# Altium PCB Teclado_V2.PcbDoc (part 2 of 2)
Units mm, origin at the board's own origin, x right, y up, seen from the top; angles counter-clockwise.
Board outline 315 x 134.96 mm, 2 copper layers (Top Layer, Bottom Layer); 272 components, 196 nets, 917 pads, 600 vias.
Unrouted connection lines stored in the file: 43.
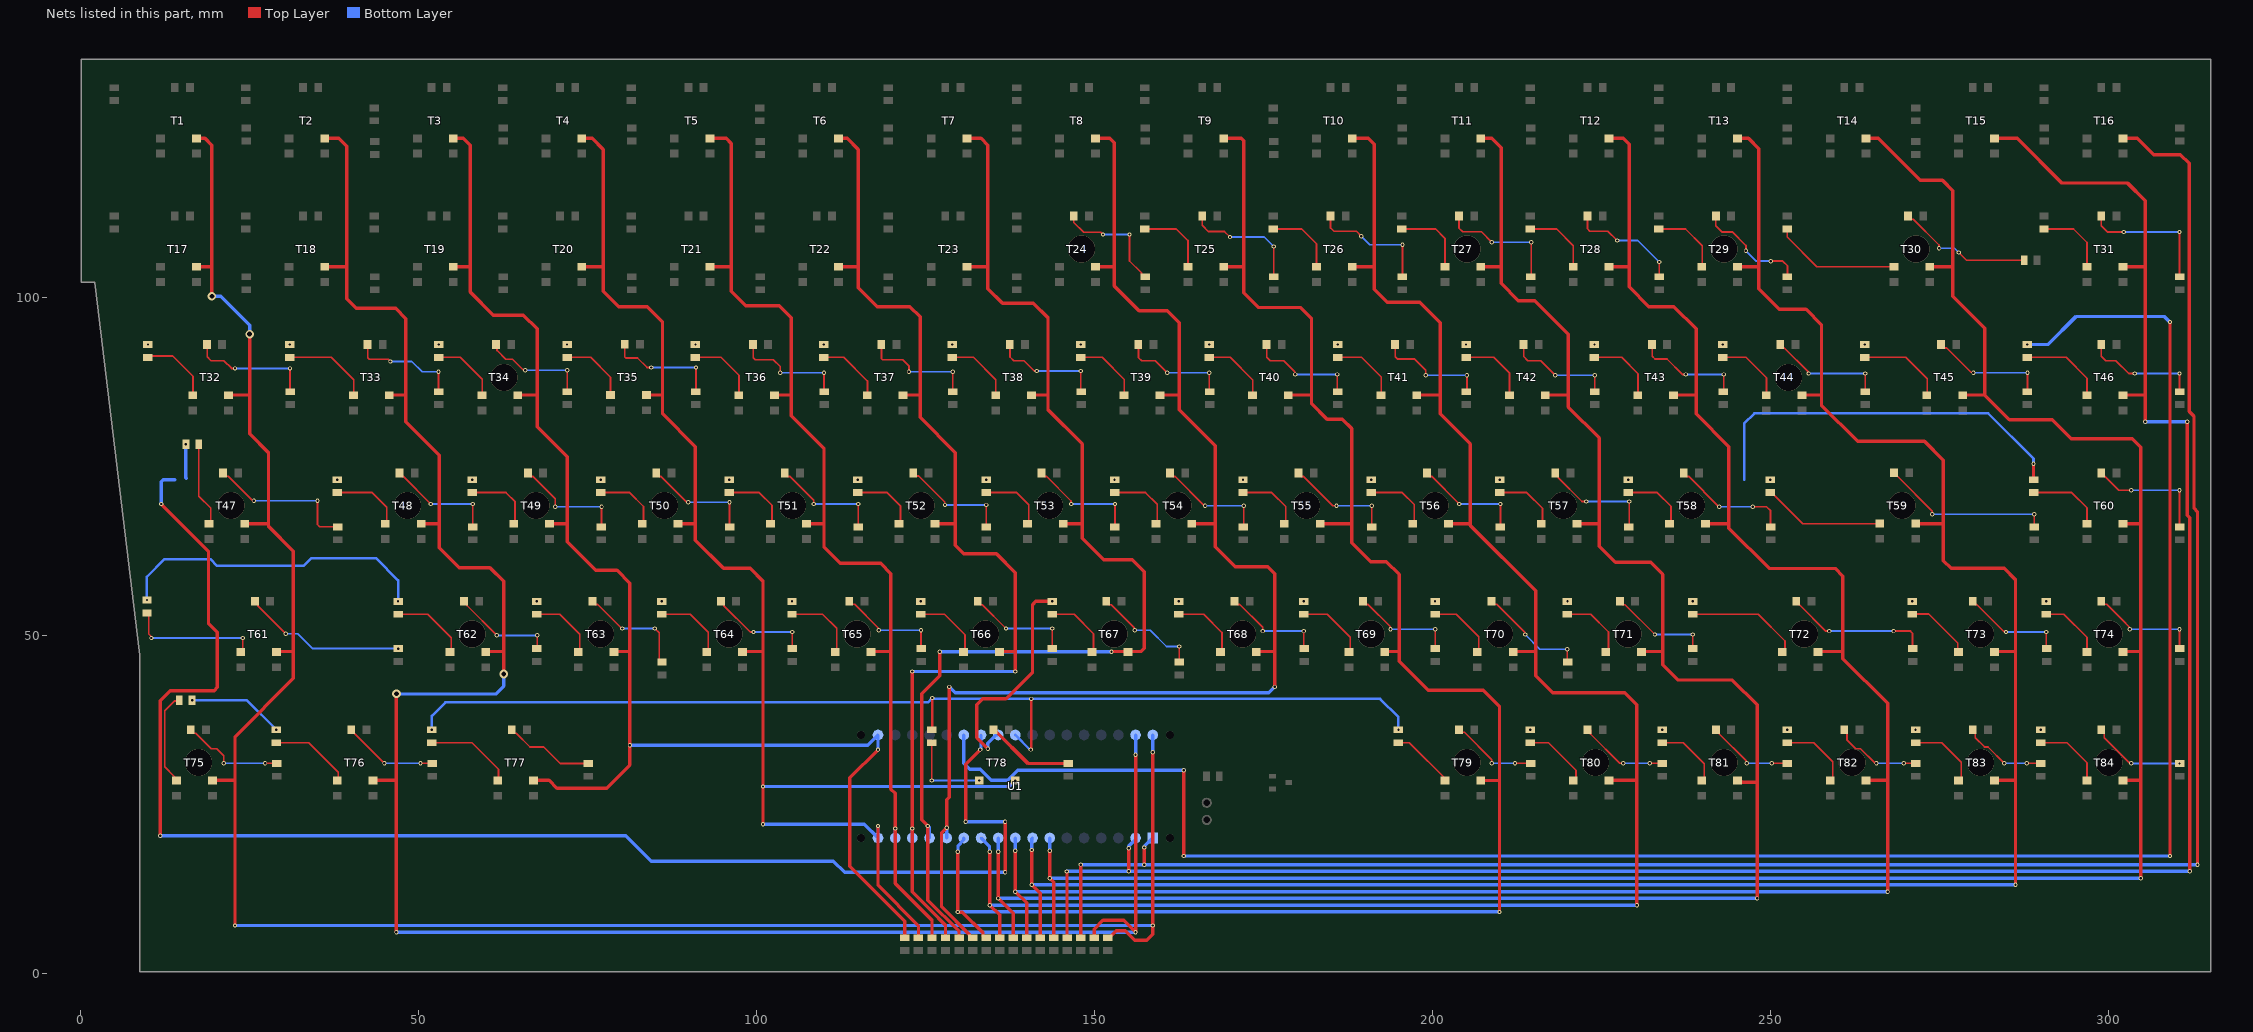
[diagram p2: the nets of this part, all layers, seen from the top]

## Via types
v1: diameter 0.635, hole 0.35, Top Layer to Bottom Layer, tented both sides, 473 vias
v2: diameter 4, hole 4, Top Layer to Bottom Layer, 84 vias
v3: diameter 2, hole 2, Top Layer to Bottom Layer, tented both sides, 29 vias
v4: diameter 1.27, hole 0.711, Top Layer to Bottom Layer, tented both sides, 14 vias

## Nets (pads, with @x,y where several pads share a name; then routed paths per layer and width w, separated by ;. In a path a pad name is that pad's centre, name@x,y a point inside that pad or via, vN(x,y) a via of type N, cw(c..) or ccw(c..) an arc to the next point about the centre after c; other vN are vias at no path point) (continued)
NetR48_1: R48.1 T24.3 | length 17.3
  Top Layer w0.254: T24.3@146.935,112.108 146.935,111.147 148.396,109.686 150.918,109.686 151.229,109.375 v1(151.257,109.375) ; v1(155.194,109.375) 155.194,105.447 156.952,103.689 156.952,103.489 157.325,103.116 R48.1@157.525,103.116
  Bottom Layer w0.254: v1(151.257,109.375) v1(155.194,109.375)
  other v2: 148.104,107.25
NetR49_1: R49.1 T25.1 | length 11
  Top Layer w0.254: R49.1@157.475,110.193 162.122,110.193 163.845,108.471 T25.1@163.845,104.598
NetR50_1: R50.1 T25.3 | length 17.7
  Top Layer w0.254: T25.3@165.935,112.108 165.935,110.74 166.855,109.82 169.227,109.82 v1(170.053,108.994) ; R50.1@176.525,103.116 176.53,103.12 v1(176.53,107.597)
  Bottom Layer w0.254: v1(170.053,108.994) 175.133,108.994 v1(176.53,107.597)
NetR51_1: R51.1 T26.1 | length 10.7
  Top Layer w0.254: R51.1@176.475,110.193 180.664,110.193 182.845,108.013 T26.1@182.845,104.598
NetR52_1: R52.1 T26.3 | length 18.2
  Top Layer w0.254: T26.3@184.935,112.108 184.935,110.335 185.436,109.834 188.771,109.834 v1(189.484,109.121) ; R52.1@195.525,103.116 195.58,103.17 v1(195.58,107.851)
  Bottom Layer w0.254: v1(189.484,109.121) 190.754,107.851 v1(195.58,107.851)
NetR53_1: R53.1 T27.1 | length 11.2
  Top Layer w0.254: R53.1@195.475,110.193 200.476,110.193 201.845,108.825 T27.1@201.845,104.598
NetR54_1: R54.1 T27.3 | length 18.5
  Top Layer w0.254: T27.3@203.935,112.108 203.935,110.291 204.462,109.764 207.256,109.764 v1(208.788,108.232) ; R54.1@214.525,103.116 214.63,103.22 v1(214.63,108.232)
  Bottom Layer w0.254: v1(208.788,108.232) v1(214.63,108.232)
  other v2: 205.104,107.25
NetR55_1: R55.1 T28.1 | length 10.5
  Top Layer w0.254: R55.1@214.475,110.193 218.383,110.193 220.845,107.732 T28.1@220.845,104.598
NetR56_1: R56.1 T28.3 | length 16.7
  Top Layer w0.254: T28.3@222.935,112.108 222.935,110.214 223.277,109.872 225.944,109.872 v1(227.33,108.486) ; R56.1@233.525,103.116 233.553,103.143 v1(233.553,105.311)
  Bottom Layer w0.254: v1(227.33,108.486) 230.378,108.486 v1(233.553,105.311)
NetR57_1: R57.1 T29.1 | length 10.6
  Top Layer w0.254: R57.1@233.475,110.193 237.433,110.193 239.903,107.724 239.903,104.656 T29.1@239.845,104.598
NetR58_1: R58.1 T29.3 | length 16.6
  Top Layer w0.254: T29.3@241.935,112.108 241.935,110.645 242.824,109.756 244.378,109.756 246.38,107.754 v1(246.38,106.962) ; v1(250.063,105.438) 251.841,105.438 252.525,104.753 R58.1@252.525,103.116
  Bottom Layer w0.254: v1(246.38,106.962) 247.904,105.438 v1(250.063,105.438)
  other v2: 243.104,107.25
NetR59_1: R59.1 T30.1 | length 18.8
  Top Layer w0.254: R59.1@252.475,110.193 252.475,108.995 256.872,104.598 T30.1@268.245,104.598
NetR60_1: R60.1 T30.3 | length 20.2
  Top Layer w0.254: T30.3@270.373,112.106 270.373,112.065 270.821,111.617 271.14,111.617 274.945,107.812 274.945,107.352 v1(274.955,107.343) ; v1(277.876,106.708) 279.019,105.565 R60.1@287.539,105.565
  Bottom Layer w0.254: v1(274.955,107.343) 277.241,107.343 v1(277.876,106.708)
  other v2: 271.544,107.25
NetR61_1: R61.1 T31.1 | length 10.8
  Top Layer w0.254: R61.1@290.475,110.193 294.837,110.193 296.845,108.186 T31.1@296.845,104.598
NetR62_1: R62.1 T31.3 | length 20.1
  Top Layer w0.254: T31.3@298.935,112.108 298.935,110.668 299.847,109.756 302.26,109.756 v1(302.26,109.741) ; v1(310.515,109.741) 310.515,103.126 R62.1@310.525,103.116
  Bottom Layer w0.254: v1(302.26,109.741) 302.26,109.756 310.515,109.756 v1(310.515,109.741)
NetR63_1: R63.1 T32.1 | length 10.7
  Top Layer w0.254: R63.1@10.008,91.395 13.661,91.395 16.644,88.413 T32.1@16.644,85.621
NetR63_2: R63.2 R65.2 R67.2 R69.2 R71.2 R73.2 R75.2 R77.2 R79.2 R81.2 R83.2 R85.2 R87.2 R89.2 R91.2 U1.23 | length 299.2
  Top Layer w0.5: v1(163.195,17.427) v1(163.195,30.127) ; v1(309.118,17.427) v1(309.118,96.421)
  Bottom Layer w0.5: U1.23@130.683,35.334 130.683,31.143 131.572,30.254 133.08,30.254 134.703,28.63 137.169,28.63 138.665,30.127 v1(163.195,30.127) ; v1(163.195,17.427) v1(309.118,17.427) ; v1(287.975,93.093) 291.059,93.093 295.209,97.244 308.295,97.244 v1(309.118,96.421)
  other v1: 9.975,93.093 30.975,93.093 52.975,93.093 71.975,93.093 90.975,93.093 109.975,93.093 128.975,93.093 147.975,93.093 166.975,93.093 185.975,93.093 204.975,93.093 223.975,93.093 242.975,93.093 263.975,93.093
NetR64_1: R64.1 T32.3 | length 18.3
  Top Layer w0.254: T32.3@18.734,93.131 18.734,91.276 19.304,90.706 21.209,90.706 22.352,89.563 v1(22.86,89.563) ; v1(30.988,89.563) 30.988,86.153 R64.1@31.025,86.116
  Bottom Layer w0.254: v1(22.86,89.563) v1(30.988,89.563)
NetR65_1: R65.1 T33.1 | length 13.1
  Top Layer w0.254: R65.1@30.975,91.193 37.104,91.193 40.414,87.884 T33.1@40.414,85.621
NetR66_1: R66.1 T33.3 | length 16.3
  Top Layer w0.254: T33.3@42.504,93.131 42.504,91.128 42.712,90.92 45.506,90.92 v1(45.847,90.579) ; v1(52.959,89.055) 52.959,86.182 R66.1@53.025,86.116
  Bottom Layer w0.254: v1(45.847,90.579) 49.022,90.579 50.546,89.055 v1(52.959,89.055)
NetR67_1: R67.1 T34.1 | length 10.1
  Top Layer w0.254: R67.1@52.975,91.193 56.154,91.193 59.414,87.934 T34.1@59.414,85.621
NetR68_1: R68.1 T34.3 | length 15.8
  Top Layer w0.254: T34.3@61.504,93.131 61.612,93.022 61.612,92.223 62.902,90.934 63.907,90.934 65.532,89.309 v1(65.786,89.309) ; v1(72.009,89.309) 72.009,86.132 R68.1@72.025,86.116
  Bottom Layer w0.254: v1(65.786,89.309) v1(72.009,89.309)
  other v2: 62.644,88.25
NetR69_1: R69.1 T35.1 | length 10.3
  Top Layer w0.254: R69.1@71.975,91.193 75.458,91.193 78.414,88.238 T35.1@78.414,85.621
NetR70_1: R70.1 T35.3 | length 16.7
  Top Layer w0.254: T35.3@80.504,93.131 80.504,91.249 80.653,91.101 82.409,91.101 83.82,89.69 v1(84.455,89.69) ; R70.1@91.025,86.116 91.059,86.149 v1(91.059,89.69)
  Bottom Layer w0.254: v1(84.455,89.69) v1(91.059,89.69)
NetR71_1: R71.1 T36.1 | length 10.5
  Top Layer w0.254: R71.1@90.975,91.193 94.762,91.193 97.414,88.542 T36.1@97.414,85.621
NetR72_1: R72.1 T36.3 | length 16.7
  Top Layer w0.254: T36.3@99.504,93.131 99.504,91.151 99.801,90.853 102.502,90.853 103.505,89.851 v1(103.505,88.928) ; v1(109.982,88.928) 109.982,86.159 R72.1@110.025,86.116
  Bottom Layer w0.254: v1(103.505,88.928) v1(109.982,88.928)
NetR73_1: R73.1 T37.1 | length 10
  Top Layer w0.254: R73.1@109.975,91.193 112.923,91.193 116.414,87.703 T37.1@116.414,85.621
NetR74_1: R74.1 T37.3 | length 16.9
  Top Layer w0.254: T37.3@118.504,93.131 118.504,91.002 118.653,90.853 121.529,90.853 121.635,90.853 122.555,89.933 v1(122.555,89.055) ; R74.1@129.025,86.116 129.032,86.122 v1(129.032,89.055)
  Bottom Layer w0.254: v1(122.555,89.055) v1(129.032,89.055)
NetR75_1: R75.1 T38.1 | length 10.1
  Top Layer w0.254: R75.1@128.975,91.193 132.1,91.193 135.414,87.88 T38.1@135.414,85.621
NetR76_1: R76.1 T38.3 | length 16.3
  Top Layer w0.254: T38.3@137.504,93.131 137.504,91.251 138.049,90.706 139.573,90.706 141.097,89.182 v1(141.478,89.182) ; v1(147.955,89.182) 147.955,86.186 R76.1@148.025,86.116
  Bottom Layer w0.254: v1(141.478,89.182) v1(147.955,89.182)
NetR77_1: R77.1 T39.1 | length 10.1
  Top Layer w0.254: R77.1@147.975,91.193 151.15,91.193 154.414,87.93 T39.1@154.414,85.621
NetR78_1: R78.1 T39.3 | length 16.2
  Top Layer w0.254: T39.3@156.504,93.131 156.504,91.174 156.972,90.706 159.004,90.706 v1(160.782,88.928) ; v1(167.005,88.928) 167.005,86.136 R78.1@167.025,86.116
  Bottom Layer w0.254: v1(160.782,88.928) v1(167.005,88.928)
NetR79_1: R79.1 T40.1 | length 10.1
  Top Layer w0.254: R79.1@166.975,91.193 170.073,91.193 173.414,87.853 T40.1@173.414,85.621
NetR80_1: R80.1 T40.3 | length 16.2
  Top Layer w0.254: T40.3@175.504,93.131 175.504,91.224 176.022,90.706 178.032,90.706 179.645,89.093 179.645,88.734 v1(179.705,88.674) ; v1(185.928,88.674) 185.928,86.213 R80.1@186.025,86.116
  Bottom Layer w0.254: v1(179.705,88.674) v1(185.928,88.674)
NetR81_1: R81.1 T41.1 | length 10.3
  Top Layer w0.254: R81.1@185.975,91.193 189.504,91.193 192.414,88.284 T41.1@192.414,85.621
NetR82_1: R82.1 T41.3 | length 16.5
  Top Layer w0.254: T41.3@194.504,93.131 194.504,91.274 194.811,90.967 197.325,90.967 199.009,89.283 v1(199.009,88.547) ; R82.1@205.025,86.116 205.105,86.195 v1(205.105,88.547)
  Bottom Layer w0.254: v1(199.009,88.547) v1(205.105,88.547)
NetR83_1: R83.1 T42.1 | length 10.6
  Top Layer w0.254: R83.1@204.975,91.193 209.062,91.193 211.414,88.842 T42.1@211.414,85.621
NetR84_1: R84.1 T42.3 | length 15.9
  Top Layer w0.254: T42.3@213.504,93.131 213.504,91.324 214.122,90.706 216.027,90.706 v1(218.186,88.547) ; R84.1@224.025,86.116 224.028,86.118 v1(224.028,88.547)
  Bottom Layer w0.254: v1(218.186,88.547) v1(224.028,88.547)
NetR85_1: R85.1 T43.1 | length 10.6
  Top Layer w0.254: R85.1@223.975,91.193 227.985,91.193 230.414,88.765 T43.1@230.414,85.621
NetR86_1: R86.1 T43.3 | length 16
  Top Layer w0.254: T43.3@232.504,93.131 232.504,91.374 232.918,90.96 234.696,90.96 236.982,88.674 v1(237.49,88.674) ; R86.1@243.025,86.116 243.078,86.168 v1(243.078,88.674)
  Bottom Layer w0.254: v1(237.49,88.674) v1(243.078,88.674)
NetR87_1: R87.1 T44.1 | length 10.2
  Top Layer w0.254: R87.1@242.975,91.193 246.4,91.193 249.414,88.18 T44.1@249.414,85.621
NetR88_1: R88.1 T44.3 | length 17.2
  Top Layer w0.254: T44.3@251.504,93.131 251.504,93 251.921,92.583 252.052,92.583 255.578,89.056 255.578,88.873 v1(255.651,88.801) ; R88.1@264.025,86.116 264.033,86.123 v1(264.033,88.801)
  Bottom Layer w0.254: v1(255.651,88.801) v1(264.033,88.801)
  other v2: 252.644,88.25
NetR89_1: R89.1 T45.1 | length 12.9
  Top Layer w0.254: R89.1@263.975,91.193 270.022,91.193 273.184,88.032 T45.1@273.184,85.621
NetR90_1: R90.1 T45.3 | length 17.4
  Top Layer w0.254: T45.3@275.274,93.131 275.274,92.99 275.681,92.583 276.095,92.583 279.677,89 279.962,89 v1(280.035,88.928) ; R90.1@288.025,86.116 288.036,86.126 v1(288.036,88.928)
  Bottom Layer w0.254: v1(280.035,88.928) v1(288.036,88.928)
NetR91_1: R91.1 T46.1 | length 12.6
  Top Layer w0.254: R91.1@287.975,91.193 293.771,91.193 296.845,88.12 T46.1@296.845,85.621
NetR92_1: R92.1 T46.3 | length 17.1
  Top Layer w0.254: T46.3@298.935,93.131 298.935,91.364 299.593,90.706 301.117,90.706 303.022,88.801 v1(303.911,88.801) ; v1(310.515,88.801) 310.515,86.126 R92.1@310.525,86.116
  Bottom Layer w0.254: v1(303.911,88.801) v1(310.515,88.801)
NetR93_1: R93.1 T47.1 | length 12.5
  Top Layer w0.254: R93.1@17.506,78.336 17.506,70.66 19.257,68.909 T47.1@19.257,66.602
NetR93_2: R93.2 R95.2 R97.2 R99.2 R101.2 R103.2 R105.2 R107.2 R109.2 R111.2 R113.2 R115.2 R117.2 R119.2 U1.24 | length 282.3
  Top Layer w0.254: R119.2@288.925,73.143 R119.2@288.975,73.094
  Top Layer w0.381: R119.2@288.925,73.143 v1(288.925,75.466)
  Top Layer w0.5: v1(11.812,20.428) 11.811,20.429 11.811,40.414 13.295,41.898 19.772,41.898 20.256,42.382 20.256,50.51 18.931,51.836 18.931,62.504 v1(11.938,69.497) ; v1(130.937,22.507) 130.937,31.016 v1(133.096,33.175) ; v1(136.779,15.014) v1(136.779,22.507)
  Bottom Layer w0.381: 246.127,73.114 246.127,81.422 247.627,82.922 282.23,82.922 288.925,76.228 v1(288.925,75.466)
  Bottom Layer w0.5: v1(11.812,20.428) 80.692,20.428 84.455,16.665 111.379,16.665 113.03,15.014 v1(136.779,15.014) ; v1(11.938,69.497) 11.938,72.801 12.237,73.1 13.969,73.1 13.975,73.094 ; v1(15.587,78.336) 15.587,73.361 15.662,73.286 ; v1(130.937,22.507) v1(136.779,22.507) ; v1(133.096,33.175) 133.096,33.211 133.223,33.338 U1.24@133.223,35.334
  other v1: 37.975,73.094 57.975,73.094 76.975,73.094 95.975,73.094 114.975,73.094 133.975,73.094 152.975,73.094 171.975,73.094 190.975,73.094 209.975,73.094 228.975,73.094 249.975,73.094
NetR94_1: R94.1 T47.3 | length 22.2
  Top Layer w0.254: T47.3@21.347,74.112 21.347,73.797 21.532,73.612 21.846,73.612 25.381,70.077 25.581,70.077 v1(25.654,70.005) ; v1(35.052,70.005) 35.052,66.472 35.381,66.142 37.999,66.142 R94.1@38.025,66.116
  Bottom Layer w0.254: v1(25.654,70.005) v1(35.052,70.005)
  other v2: 22.255,69.25
NetR95_1: R95.1 T48.1 | length 10.6
  Top Layer w0.254: R95.1@37.975,71.193 43.134,71.193 45.292,69.036 T48.1@45.292,66.602
NetR96_1: R96.1 T48.3 | length 15.9
  Top Layer w0.254: T48.3@47.382,73.931 47.382,73.832 47.631,73.583 47.73,73.583 v1(51.816,69.497) ; R96.1@58.025,66.116 58.039,66.129 v1(58.039,69.497)
  Bottom Layer w0.254: v1(51.816,69.497) v1(58.039,69.497)
  other v2: 48.354,69.25
NetR97_1: R97.1 T49.1 | length 10.1
  Top Layer w0.254: R97.1@57.975,71.193 62.946,71.193 64.292,69.848 T49.1@64.292,66.602
NetR98_1: R98.1 T49.3 | length 16.6
  Top Layer w0.254: T49.3@66.382,74.112 66.382,73.832 66.631,73.583 66.911,73.583 70.231,70.263 v1(70.231,69.116) ; R98.1@77.025,66.116 77.089,66.179 v1(77.089,69.116)
  Bottom Layer w0.254: v1(70.231,69.116) v1(77.089,69.116)
  other v2: 67.354,69.25
NetR99_1: R99.1 T50.1 | length 9.7
  Top Layer w0.254: R99.1@76.975,71.193 81.234,71.193 83.292,69.136 T50.1@83.292,66.602
NetR100_1: R100.1 T50.3 | length 16.2
  Top Layer w0.254: T50.3@85.382,74.031 85.382,73.834 85.633,73.583 85.83,73.583 89.662,69.751 v1(89.916,69.751) ; v1(96.012,69.751) 96.012,66.129 R100.1@96.025,66.116
  Bottom Layer w0.254: v1(89.916,69.751) v1(96.012,69.751)
  other v2: 86.356,69.25
NetR101_1: R101.1 T51.1 | length 9.8
  Top Layer w0.254: R101.1@95.975,71.193 100.411,71.193 102.292,69.313 T51.1@102.292,66.602
NetR102_1: R102.1 T51.3 | length 16.5
  Top Layer w0.254: T51.3@104.382,74.112 104.382,73.832 104.631,73.583 104.911,73.583 108.458,70.036 v1(108.458,69.497) ; R102.1@115.025,66.116 115.062,66.152 v1(115.062,69.497)
  Bottom Layer w0.254: v1(108.458,69.497) v1(115.062,69.497)
  other v2: 105.354,69.25
NetR103_1: R103.1 T52.1 | length 9.8
  Top Layer w0.254: R103.1@114.975,71.193 119.334,71.193 121.292,69.236 T52.1@121.292,66.602
NetR104_1: R104.1 T52.3 | length 16.3
  Top Layer w0.254: T52.3@123.185,74.106 123.185,74.099 123.633,73.651 123.986,73.651 127.839,69.799 127.839,69.42 v1(127.889,69.37) ; v1(133.985,69.37) 133.985,66.156 R104.1@134.025,66.116
  Bottom Layer w0.254: v1(127.889,69.37) v1(133.985,69.37)
  other v2: 124.356,69.25
NetR105_1: R105.1 T53.1 | length 9.9
  Top Layer w0.254: R105.1@133.975,71.193 138.511,71.193 140.292,69.413 T53.1@140.292,66.602
NetR106_1: R106.1 T53.3 | length 16.4
  Top Layer w0.254: T53.3@142.382,74.112 142.382,73.832 142.631,73.583 142.911,73.583 146.538,69.956 146.538,69.517 v1(146.558,69.497) ; R106.1@153.025,66.116 153.035,66.125 v1(153.035,69.497)
  Bottom Layer w0.254: v1(146.558,69.497) v1(153.035,69.497)
  other v2: 143.354,69.25
NetR107_1: R107.1 T54.1 | length 9.9
  Top Layer w0.254: R107.1@152.975,71.193 157.561,71.193 159.292,69.463 T54.1@159.292,66.602
NetR108_1: R108.1 T54.3 | length 16
  Top Layer w0.254: T54.3@161.382,74.112 161.382,73.832 161.631,73.583 161.911,73.583 166.178,69.315 166.297,69.315 v1(166.37,69.243) ; R108.1@172.025,66.116 172.085,66.175 v1(172.085,69.243)
  Bottom Layer w0.254: v1(166.37,69.243) v1(172.085,69.243)
  other v2: 162.354,69.25
NetR109_1: R109.1 T55.1 | length 9.7
  Top Layer w0.254: R109.1@171.975,71.193 176.23,71.193 178.292,69.132 T55.1@178.292,66.602
NetR110_1: R110.1 T55.3 | length 15.9
  Top Layer w0.254: T55.3@180.382,74.112 180.382,73.832 180.631,73.583 180.911,73.583 185.251,69.243 v1(185.801,69.243) ; v1(191.008,69.243) 191.008,66.133 R110.1@191.025,66.116
  Bottom Layer w0.254: v1(185.801,69.243) v1(191.008,69.243)
  other v2: 181.354,69.25
NetR111_1: R111.1 T56.1 | length 9.9
  Top Layer w0.254: R111.1@190.975,71.193 195.534,71.193 197.292,69.436 T56.1@197.292,66.602
NetR112_1: R112.1 T56.3 | length 16.1
  Top Layer w0.254: T56.3@199.382,74.077 199.382,73.832 199.631,73.583 199.876,73.583 v1(203.962,69.497) ; R112.1@210.025,66.116 210.058,66.148 v1(210.058,69.497)
  Bottom Layer w0.254: v1(203.962,69.497) v1(210.058,69.497)
  other v2: 200.354,69.25
NetR113_1: R113.1 T57.1 | length 9.5
  Top Layer w0.254: R113.1@209.975,71.193 213.949,71.193 216.292,68.851 T57.1@216.292,66.602
NetR114_1: R114.1 T57.3 | length 16.6
  Top Layer w0.254: T57.3@218.382,74.112 218.633,73.861 218.633,73.368 222.123,69.878 v1(222.758,69.878) ; R114.1@229.025,66.116 229.108,66.198 v1(229.108,69.878)
  Bottom Layer w0.254: v1(222.758,69.878) v1(229.108,69.878)
  other v2: 219.356,69.25
NetR115_1: R115.1 T58.1 | length 9.7
  Top Layer w0.254: R115.1@228.975,71.193 233.253,71.193 235.292,69.155 T58.1@235.292,66.602
NetR116_1: R116.1 T58.3 | length 17.5
  Top Layer w0.254: T58.3@237.382,74.112 237.382,73.832 237.631,73.583 237.911,73.583 242.378,69.116 v1(242.443,69.116) ; v1(247.396,69.116) 249.428,69.116 250.025,68.518 R116.1@250.025,66.116
  Bottom Layer w0.254: v1(242.443,69.116) v1(247.396,69.116)
  other v2: 238.354,69.25
NetR117_1: R117.1 T59.1 | length 18.1
  Top Layer w0.254: R117.1@249.975,71.193 250.175,71.193 254.767,66.602 T59.1@266.192,66.602
NetR118_1: R118.1 T59.3 | length 25.5
  Top Layer w0.254: T59.3@268.282,74.112 268.282,74.037 268.73,73.589 268.805,73.589 273.939,68.455 v1(273.939,67.973) ; R118.1@289.025,66.116 289.052,66.142 v1(289.052,67.973)
  Bottom Layer w0.254: v1(273.939,67.973) v1(289.052,67.973)
  other v2: 269.453,69.256
NetR119_1: R119.1 T60.1 | length 11.1
  Top Layer w0.254: R119.1@288.975,71.193 294.594,71.193 296.845,68.943 T60.1@296.845,66.602
NetR120_1: R120.1 T60.3 | length 18.1
  Top Layer w0.254: T60.3@298.935,74.112 298.935,74.031 299.383,73.583 299.464,73.583 301.518,71.529 v1(303.403,71.529) ; v1(310.515,71.529) 310.515,66.126 R120.1@310.525,66.116
  Bottom Layer w0.254: v1(303.403,71.529) v1(310.515,71.529)
NetR121_1: R121.1 T61.1 | length 19.6
  Top Layer w0.254: R121.1@9.835,53.394 10.086,53.143 10.086,50.267 10.578,49.774 v1(10.489,49.685) ; T61.1@23.956,47.679 24.003,47.726 v1(24.003,49.685)
  Bottom Layer w0.254: v1(10.489,49.685) 10.668,49.685 v1(24.003,49.685)
NetR121_2: R121.2 R123.2 R125.2 R127.2 R129.2 R131.2 R133.2 R135.2 R137.2 R139.2 R141.2 R143.2 R145.2 R147.2 U1.25 | length 80.4
  Top Layer w0.5: v1(134.239,33.302) 132.588,34.953 132.588,39.779 133.477,40.668 136.924,40.668 140.843,44.587 140.843,54.638 141.299,55.094 v1(143.739,55.094)
  Bottom Layer w0.381: v1@9.818,55.294 9.818,58.741 12.415,61.338 19.208,61.338 20.193,60.353 33.02,60.353 34.163,61.496 43.688,61.496 46.975,58.209 v1(46.975,55.094)
  Bottom Layer w0.5: v1(134.239,33.302) 134.239,34.133 135.014,34.908 135.047,34.908 135.472,35.334 U1.25@135.763,35.334
  other v1: 67.475,55.094 85.975,55.094 105.258,55.094 124.316,55.094 162.475,55.094 180.958,55.094 200.389,55.094 219.975,55.094 238.489,55.094 270.975,55.094 290.805,55.094 9.835,55.294
NetR122_1: R122.1 T61.3 | length 24.2
  Top Layer w0.254: T61.3@26.046,55.189 26.242,54.993 26.242,54.431 v1(30.353,50.32)
  Bottom Layer w0.254: v1(30.353,50.32) 32.131,50.32 34.335,48.116 v1(47.025,48.116)
NetR123_1: R123.1 T62.1 | length 11.3
  Top Layer w0.254: R123.1@46.975,53.194 51.355,53.194 54.856,49.693 T62.1@54.856,47.679
NetR124_1: R124.1 T62.3 | length 14.4
  Top Layer w0.254: T62.3@56.946,55.189 57.181,54.954 57.181,54.48 v1(61.595,50.066) ; 67.564,48.669 v1(67.564,50.066)
  Bottom Layer w0.254: v1(61.595,50.066) v1(67.564,50.066)
  other v2: 57.904,50.25
NetR125_1: R125.1 T63.1 | length 10.2
  Top Layer w0.254: R125.1@67.475,53.194 70.913,53.194 73.856,50.251 T63.1@73.856,47.679
NetR126_1: R126.1 T63.3 | length 16.3
  Top Layer w0.254: T63.3@75.946,55.189 75.946,54.861 76.181,54.626 76.509,54.626 80.053,51.082 v1(80.137,51.082) ; v1(84.963,51.082) 85.598,50.447 85.598,46.489 85.971,46.116 R126.1@86.025,46.116
  Bottom Layer w0.254: v1(80.137,51.082) v1(84.963,51.082)
  other v2: 76.904,50.25
NetR127_1: R127.1 T64.1 | length 10.9
  Top Layer w0.254: R127.1@85.975,53.194 90.217,53.194 92.856,50.555 T64.1@92.856,47.679
NetR128_1: R128.1 T64.3 | length 15
  Top Layer w0.254: T64.3@94.946,55.189 95.183,54.952 95.183,54.451 99.06,50.574 v1(99.568,50.574) ; v1(105.283,50.574) 105.283,48.141 R128.1@105.308,48.116
  Bottom Layer w0.254: v1(99.568,50.574) v1(105.283,50.574)
  other v2: 95.906,50.25
NetR129_1: R129.1 T65.1 | length 10.9
  Top Layer w0.254: R129.1@105.258,53.194 109.775,53.194 111.856,51.113 T65.1@111.856,47.679
NetR130_1: R130.1 T65.3 | length 15.3
  Top Layer w0.254: T65.3@113.735,55.106 114.179,54.661 114.542,54.661 118.037,51.166 118.037,50.9 v1(118.11,50.828) ; v1(124.333,50.828) 124.333,48.149 R130.1@124.367,48.116
  Bottom Layer w0.254: v1(118.11,50.828) v1(124.333,50.828)
  other v2: 114.906,50.25
NetR131_1: R131.1 T66.1 | length 10.3
  Top Layer w0.254: R131.1@124.316,53.194 127.809,53.194 130.856,50.147 T66.1@130.856,47.679
NetR132_1: R132.1 T66.3 | length 15.6
  Top Layer w0.254: T66.3@132.946,55.042 132.946,54.82 133.183,54.583 133.405,54.583 v1(136.906,51.082) ; v1(143.764,51.082) 143.764,48.141 R132.1@143.789,48.116
  Bottom Layer w0.254: v1(136.906,51.082) v1(143.764,51.082)
  other v2: 133.906,50.25
NetR133_1: R133.1 T67.1 | length 10
  Top Layer w0.254: R133.1@143.739,53.194 146.986,53.194 149.856,50.324 T67.1@149.856,47.679
NetR134_1: R134.1 T67.3 | length 16.1
  Top Layer w0.254: T67.3@151.735,55.106 151.735,55.051 152.183,54.603 152.488,54.603 155.883,51.208 155.883,50.9 v1(155.956,50.828) ; R134.1@162.525,46.116 162.56,46.15 v1(162.56,48.415)
  Bottom Layer w0.254: v1(155.956,50.828) 158.242,50.828 160.655,48.415 v1(162.56,48.415)
  other v2: 152.906,50.25
NetR135_1: R135.1 T68.1 | length 10.3
  Top Layer w0.254: R135.1@162.475,53.194 166.163,53.194 168.856,50.501 T68.1@168.856,47.679
NetR136_1: R136.1 T68.3 | length 15
  Top Layer w0.254: T68.3@170.946,55.189 170.946,54.861 171.181,54.626 171.509,54.626 174.879,51.256 v1(174.879,50.701) ; v1(180.975,50.701) 180.975,48.149 R136.1@181.009,48.116
  Bottom Layer w0.254: v1(174.879,50.701) v1(180.975,50.701)
  other v2: 171.904,50.25
NetR137_1: R137.1 T69.1 | length 10.4
  Top Layer w0.254: R137.1@180.958,53.194 184.451,53.194 187.856,49.789 T69.1@187.856,47.679
NetR138_1: R138.1 T69.3 | length 15.5
  Top Layer w0.254: T69.3@189.946,55.189 189.946,54.862 190.183,54.625 190.51,54.625 193.751,51.383 193.751,51.005 v1(193.802,50.955) ; v1(200.406,50.955) 200.406,48.149 R138.1@200.44,48.116
  Bottom Layer w0.254: v1(193.802,50.955) v1(200.406,50.955)
  other v2: 190.906,50.25
NetR139_1: R139.1 T70.1 | length 10
  Top Layer w0.254: R139.1@200.389,53.194 203.501,53.194 206.856,49.839 T70.1@206.856,47.679
NetR140_1: R140.1 T70.3 | length 16.3
  Top Layer w0.254: T70.3@208.733,55.106 209.162,54.677 209.54,54.677 213.668,50.549 213.668,50.265 v1(213.741,50.193) ; v1(219.964,48.034) 219.964,46.177 R140.1@220.025,46.116
  Bottom Layer w0.254: v1(213.741,50.193) 215.9,48.034 v1(219.964,48.034)
  other v2: 209.904,50.25
NetR141_1: R141.1 T71.1 | length 10.1
  Top Layer w0.254: R141.1@219.975,53.194 223.44,53.194 226.056,50.578 T71.1@226.056,47.679
NetR142_1: R142.1 T71.3 | length 14.6
  Top Layer w0.254: T71.3@228.146,54.965 228.146,54.65 228.183,54.613 228.498,54.613 v1(232.918,50.193) ; v1(238.506,50.193) 238.506,48.149 R142.1@238.54,48.116
  Bottom Layer w0.254: v1(232.918,50.193) v1(238.506,50.193)
  other v2: 228.906,50.25
NetR143_1: R143.1 T72.1 | length 16.9
  Top Layer w0.254: R143.1@238.489,53.194 248.205,53.194 252.156,49.243 T72.1@252.156,47.679
NetR144_1: R144.1 T72.3 | length 21.4
  Top Layer w0.254: T72.3@254.246,55.189 254.246,54.62 254.283,54.583 254.309,54.583 258.191,50.701 v1(258.699,50.701) ; v1(268.224,50.701) 270.716,50.701 271.022,50.395 R144.1@271.022,48.076
  Bottom Layer w0.254: v1(258.699,50.701) v1(268.224,50.701)
  other v2: 255.006,50.25
NetR145_1: R145.1 T73.1 | length 10.1
  Top Layer w0.254: R145.1@270.975,53.241 273.431,53.241 277.723,48.949 277.723,48.127 278.171,47.679 T73.1@278.246,47.679
NetR146_1: R146.1 T73.3 | length 14.8
  Top Layer w0.254: T73.3@280.336,54.816 280.336,54.63 280.383,54.583 280.569,54.583 284.505,50.646 284.788,50.646 v1(284.861,50.574) ; v1(290.83,50.574) 290.83,48.141 R146.1@290.855,48.116
  Bottom Layer w0.254: v1(284.861,50.574) v1(290.83,50.574)
  other v2: 281.106,50.25
NetR147_1: R147.1 T74.1 | length 9.5
  Top Layer w0.254: R147.1@290.805,53.194 293.417,53.194 296.845,49.766 T74.1@296.845,47.679
NetR148_1: R148.1 T74.3 | length 16.3
  Top Layer w0.254: T74.3@298.935,55.106 298.935,55.102 299.383,54.654 299.739,54.654 302.03,52.364 303.076,51.317 303.076,51.027 v1(303.149,50.955) ; v1(310.515,50.955) 310.515,48.126 R148.1@310.525,48.116
  Bottom Layer w0.254: v1(303.149,50.955) v1(310.515,50.955)
  other v2: 300.106,50.25
NetR149_1: R149.1 T75.1 | length 14
  Top Layer w0.254: T75.1@14.431,28.629 14.356,28.629 13.908,29.077 13.908,29.152 12.446,30.614 12.446,38.914 13.878,40.346 14.489,40.346 R149.1@14.61,40.467
NetR149_2: R149.2 R151.2 R153.2 R155.2 R157.2 R159.2 R161.2 R163.2 R165.2 R167.2 U1.26 | length 179
  Top Layer w0.381: R155.2@125.927,36.094 R155.2@125.984,36.094 ; v1(125.984,40.795) R155.2@125.984,36.094 ; R155.2@126.127,36.094 R155.2@125.984,36.094 ; v1(140.589,33.175) 140.638,33.223 140.638,33.403 140.648,33.414 v1(140.648,40.668)
  Bottom Layer w0.381: v1(16.51,40.467) 24.601,40.467 28.956,36.112 v1@28.956,36.068 ; v1(51.975,36.094) 51.975,38.159 53.985,40.17 125.359,40.17 v1(125.984,40.795) ; v1@125.984,40.668 140.589,40.668 192.278,40.668 194.975,37.971 v1(194.975,36.094) ; U1.26@138.303,35.334 140.413,33.223 140.54,33.223 v1(140.589,33.175)
  other v1: 28.975,36.094 214.475,36.094 233.975,36.094 252.475,36.094 271.475,36.094 289.975,36.094
NetR150_1: R150.1 T75.3 | length 15.4
  Top Layer w0.254: T75.3@16.521,36.139 16.521,35.836 16.757,35.6 17.059,35.6 19.346,33.314 20.14,33.314 21.209,32.245 v1(21.209,31.143) ; v1(27.305,31.143) 28.998,31.143 R150.1@29.025,31.116
  Bottom Layer w0.254: v1(21.209,31.143) v1(27.305,31.143)
  other v2: 17.48,31.25
NetR151_1: R151.1 T76.1 | length 12.2
  Top Layer w0.254: R151.1@28.975,34.194 33.779,34.194 38.131,29.842 T76.1@38.131,28.629
NetR152_1: R152.1 T76.3 | length 13.8
  Top Layer w0.254: T76.3@40.221,35.88 40.221,35.868 40.506,35.583 40.518,35.583 v1(44.958,31.143) ; v1(50.292,31.143) 51.998,31.143 R152.1@52.025,31.116
  Bottom Layer w0.254: v1(44.958,31.143) v1(50.292,31.143)
NetR153_1: R153.1 T77.1 | length 13.1
  Top Layer w0.254: R153.1@51.975,34.194 57.909,34.194 61.831,30.272 T77.1@61.831,28.629
NetR154_1: R154.1 T77.3 | length 13.4
  Top Layer w0.254: T77.3@63.921,36.139 63.921,35.918 64.256,35.583 64.477,35.583 66.504,33.556 68.547,33.556 70.987,31.116 R154.1@75.082,31.116
NetR155_1: R155.1 T78.1 | length 12.6
  Top Layer w0.254: v1(125.927,28.603) R155.1@125.927,34.194
  Bottom Layer w0.254: v1(125.927,28.603) 125.931,28.599 132.965,28.599 v1(132.969,28.596)
NetR156_1: R156.1 T78.3 | length 13
  Top Layer w0.5: T78.3@135.221,36.139 135.221,36.064 140.169,31.116 R156.1@146.142,31.116
NetR157_1: R157.1 T79.1 | length 9.6
  Top Layer w0.254: R157.1@194.975,34.194 196.591,34.194 202.156,28.629 T79.1@202.231,28.629
NetR158_1: R158.1 T79.3 | length 12.8
  Top Layer w0.254: T79.3@204.321,36.139 204.321,35.779 204.382,35.718 204.741,35.718 208.788,31.672 v1(208.788,31.143) ; v1(212.217,31.143) 214.498,31.143 R158.1@214.525,31.116
  Bottom Layer w0.254: v1(208.788,31.143) v1(212.217,31.143)
  other v2: 205.105,31.25
NetR159_1: R159.1 T80.1 | length 9.9
  Top Layer w0.254: R159.1@214.475,34.194 217.167,34.194 221.231,30.13 T80.1@221.231,28.629
NetR160_1: R160.1 T80.3 | length 13.1
  Top Layer w0.254: T80.3@223.321,36.139 223.382,36.078 223.382,35.472 227.711,31.143 v1(228.219,31.143) ; v1(232.156,31.143) 233.998,31.143 R160.1@234.025,31.116
  Bottom Layer w0.254: v1(228.219,31.143) v1(232.156,31.143)
  other v2: 224.105,31.25
NetR161_1: R161.1 T81.1 | length 10
  Top Layer w0.254: R161.1@233.975,34.194 237.106,34.194 240.231,31.069 T81.1@240.231,28.629
NetR162_1: R162.1 T81.3 | length 12.8
  Top Layer w0.254: T81.3@242.321,36.139 242.382,36.078 242.382,35.554 246.434,31.501 246.434,31.215 v1(246.507,31.143) ; v1(250.19,31.143) 252.498,31.143 R162.1@252.525,31.116
  Bottom Layer w0.254: v1(246.507,31.143) v1(250.19,31.143)
  other v2: 243.105,31.25
NetR163_1: R163.1 T82.1 | length 10.7
  Top Layer w0.254: R163.1@252.475,34.194 256.41,34.194 259.231,31.373 T82.1@259.231,28.629
NetR164_1: R164.1 T82.3 | length 13.2
  Top Layer w0.254: T82.3@261.321,36.139 261.321,34.617 262.624,33.314 263.333,33.314 265.504,31.143 v1(265.684,31.143) ; v1(269.748,31.143) 271.498,31.143 R164.1@271.525,31.116
  Bottom Layer w0.254: v1(265.684,31.143) v1(269.748,31.143)
  other v2: 262.104,31.25
NetR165_1: R165.1 T83.1 | length 10.6
  Top Layer w0.254: R165.1@271.475,34.194 275.333,34.194 278.231,31.296 T83.1@278.231,28.629
NetR166_1: R166.1 T83.3 | length 12.5
  Top Layer w0.254: T83.3@280.321,36.139 280.321,34.921 281.686,33.556 282.194,33.556 v1(284.607,31.143) ; v1(287.909,31.143) 289.998,31.143 R166.1@290.025,31.116
  Bottom Layer w0.254: v1(284.607,31.143) v1(287.909,31.143)
  other v2: 281.104,31.25
NetR167_1: R167.1 T84.1 | length 10.7
  Top Layer w0.254: R167.1@289.975,34.194 293.875,34.194 296.845,31.224 T84.1@296.845,28.629
NetR168_1: R168.1 T84.3 | length 14.1
  Top Layer w0.254: T84.3@298.935,36.139 299.383,35.691 299.383,34.909 303.149,31.143 v1(303.403,31.143)
  Bottom Layer w0.254: v1(303.403,31.143) 303.416,31.129 310.512,31.129 v1(310.525,31.116)
  other v2: 300.104,31.25
NetR169_2: R169.2 T1.2 T17.2 T32.2 T47.2 T61.2 T75.2 U1.34 | length 314.5
  Top Layer w0.5: T17.2@17.145,104.598 19.382,104.598 19.431,104.549 ; T1.2@17.145,123.598 18.416,123.598 19.431,122.583 19.431,104.549 ; v4(19.431,100.231) 19.431,104.549 ; T75.2@19.731,28.629 22.567,28.629 ; T32.2@21.944,85.621 24.887,85.621 25.019,85.753 ; v1(22.86,7.155) 22.86,35.08 31.496,43.716 31.496,47.653 ; T47.2@24.557,66.602 27.787,66.602 27.813,66.576 ; v4(25.019,94.643) 25.019,85.753 ; T61.2@29.256,47.679 31.47,47.679 31.496,47.653 ; R169.2@151.966,5.348 152.166,5.348 153.196,6.378 154.559,6.378 155.956,4.981 157.734,4.981 158.623,5.87 v1(158.623,7.155) v1(158.623,32.794) ; 25.019,85.753 25.019,79.911 27.813,77.117 27.813,66.576 ; 27.813,66.576 27.813,66.195 31.496,62.512 31.496,47.653
  Bottom Layer w0.5: v4(19.431,100.231) 20.739,100.231 25.019,95.951 v4(25.019,94.643) ; v1(22.86,7.155) v1(158.623,7.155) ; v1(158.623,32.794) U1.34@158.623,35.334
NetR170_2: R170.2 T2.2 T18.2 T33.2 T48.2 T62.2 T76.2 U1.33 | length 312.1
  Top Layer w0.5: T18.2@36.145,104.598 39.292,104.598 39.37,104.676 ; T2.2@36.143,123.596 38.228,123.598 39.37,122.456 39.37,104.676 ; T76.2@43.431,28.629 46.736,28.629 ; T33.2@45.714,85.621 48.001,85.621 48.133,85.753 ; v1(46.736,6.155) 46.736,28.629 ; v4(46.752,41.436) 46.736,41.42 46.736,28.629 ; T48.2@50.592,66.602 53.06,66.602 53.086,66.576 ; T62.2@60.156,47.679 62.585,47.679 62.611,47.653 ; v4(62.611,44.351) 62.611,47.653 ; R170.2@149.966,5.348 149.966,6.61 151.257,7.902 154.336,7.902 v1(156.083,6.155) v1(156.083,32.413) ; 39.37,104.676 39.37,99.85 40.767,98.453 46.609,98.453 48.133,96.929 48.133,85.753 ; 48.133,85.753 48.133,81.689 53.086,76.736 53.086,66.576 ; 53.086,66.576 53.086,63.02 56.007,60.099 60.579,60.099 62.611,58.067 62.611,47.653
  Bottom Layer w0.5: v1(46.736,6.155) v1(156.083,6.155) ; v4(46.752,41.436) 46.796,41.392 61.43,41.392 62.611,42.573 v4(62.611,44.351) ; v1(156.083,32.413) U1.33@156.083,35.334
NetR171_2: R171.2 T3.2 T19.2 T34.2 T49.2 T63.2 T77.2 U1.18 | length 207.4
  Top Layer w0.5: T19.2@55.145,104.598 57.58,104.598 57.658,104.676 ; T3.2@55.145,123.598 56.643,123.598 57.658,122.583 57.658,104.676 ; T34.2@64.714,85.621 67.442,85.621 67.564,85.499 ; T77.2@67.131,28.629 69.316,28.629 70.485,27.46 77.851,27.46 81.28,30.889 v1(81.28,33.81) 81.28,47.78 ; T49.2@69.592,66.602 71.983,66.602 72.009,66.576 ; T63.2@79.156,47.679 81.179,47.679 81.28,47.78 ; v1(117.983,33.175) 113.792,28.984 113.792,15.903 121.92,7.775 121.92,5.393 R171.2@121.966,5.348 ; 57.658,104.676 57.658,100.866 61.087,97.437 65.532,97.437 67.564,95.405 67.564,85.499 ; 67.564,85.499 67.564,80.927 72.009,76.482 72.009,66.576 ; 72.009,66.576 72.009,63.909 76.2,59.718 79.375,59.718 81.28,57.813 81.28,47.78
  Bottom Layer w0.5: v1(81.28,33.81) 116.459,33.81 U1.18@117.983,35.334 v1(117.983,33.175)
NetR172_2: R172.2 T4.2 T20.2 T35.2 T50.2 T64.2 T78.2 U1.17 | length 205.3
  Top Layer w0.5: T20.2@74.145,104.598 77.294,104.598 77.343,104.549 ; T4.2@74.145,123.598 75.693,123.598 77.343,121.948 77.343,104.549 ; T35.2@83.714,85.621 86.101,85.621 86.106,85.626 ; T50.2@88.592,66.602 90.932,66.602 ; T64.2@98.156,47.679 100.965,47.679 ; v1(100.965,22.126) v1(100.965,27.714) 100.965,58.067 99.06,59.972 95.123,59.972 90.932,64.163 90.932,66.602 ; v1(117.983,21.872) 117.983,13.109 123.966,7.126 R172.2@123.966,5.348 ; 77.343,104.549 77.343,100.993 79.629,98.707 83.82,98.707 86.106,96.421 86.106,85.626 ; 86.106,85.626 86.106,82.832 90.932,78.006 90.932,66.602
  Bottom Layer w0.5: v1(100.965,22.126) 115.951,22.126 U1.17@117.983,20.094 v1(117.983,21.872) ; v1(100.965,27.714) 137.414,27.714 v1(138.269,28.569)
NetR173_2: R173.2 T5.2 T21.2 T36.2 T51.2 T65.2 U1.16 | length 151.7
  Top Layer w0.5: T21.2@93.145,104.598 96.217,104.598 96.266,104.549 ; T5.2@93.145,123.598 95.505,123.598 96.266,122.837 96.266,104.549 ; T36.2@102.714,85.621 105.151,85.621 105.156,85.626 ; T51.2@107.592,66.602 109.956,66.602 109.982,66.576 ; T65.2@117.156,47.679 119.888,47.679 ; R173.2@125.966,5.348 125.966,7.92 120.523,13.363 v1(120.523,21.491) 120.523,26.698 119.888,27.333 119.888,47.679 ; 96.266,104.549 96.266,100.993 98.425,98.834 103.378,98.834 105.156,97.056 105.156,85.626 ; 105.156,85.626 105.156,82.578 109.982,77.752 109.982,66.576 ; 109.982,66.576 109.982,63.147 112.395,60.734 118.364,60.734 119.888,59.21 119.888,47.679
  Bottom Layer w0.5: U1.16@120.523,20.094 v1(120.523,21.491)
NetR174_2: R174.2 T6.2 T22.2 T37.2 T52.2 T66.2 U1.15 | length 164.7
  Top Layer w0.5: T22.2@112.145,104.598 115.013,104.598 115.062,104.549 ; T6.2@112.145,123.598 113.412,123.598 115.062,121.948 115.062,104.549 ; T37.2@121.714,85.621 124.201,85.621 124.206,85.626 ; v1(123.063,44.732) v1(123.063,21.491) 123.063,12.117 125.873,9.307 127.966,7.215 R174.2@127.966,5.348 ; T52.2@126.592,66.602 129.26,66.602 129.413,66.449 ; T66.2@136.156,47.679 138.202,47.679 138.303,47.78 ; v1(138.303,44.732) 138.303,47.78 ; 115.062,104.549 115.062,101.501 117.856,98.707 122.682,98.707 124.206,97.183 124.206,85.626 ; 124.206,85.626 124.206,82.324 129.413,77.117 129.413,66.449 ; 129.413,66.449 129.413,63.401 130.683,62.131 135.509,62.131 138.303,59.337 138.303,47.78
  Bottom Layer w0.5: U1.15@123.063,20.094 v1(123.063,21.491) ; v1(123.063,44.732) v1(138.303,44.732)
NetR175_2: R175.2 T7.2 T23.2 T38.2 T53.2 T67.2 U1.14 | length 178.9
  Top Layer w0.5: v1(127.127,47.653) 127.127,44.097 124.46,41.43 124.46,22.761 v1(125.349,21.872) 125.349,10.898 129.966,6.281 R175.2@129.966,5.348 ; T23.2@131.145,104.598 134.19,104.598 134.239,104.549 ; T7.2@131.145,123.598 133.224,123.598 134.239,122.583 134.239,104.549 ; T38.2@140.714,85.621 142.997,85.621 143.129,85.753 ; T53.2@145.592,66.602 148.056,66.602 148.209,66.449 ; v1(152.527,47.653) 152.553,47.679 155.156,47.679 156.871,47.679 157.353,48.161 157.353,59.464 155.575,61.242 151.384,61.242 148.209,64.417 148.209,66.449 ; 134.239,104.549 134.239,101.374 136.398,99.215 140.97,99.215 143.129,97.056 143.129,85.753 ; 143.129,85.753 143.129,83.467 148.209,78.387 148.209,66.449
  Bottom Layer w0.5: v1(125.349,21.872) 125.349,21.835 125.603,21.581 U1.14@125.603,20.094 ; v1(127.127,47.653) v1(152.527,47.653)
NetR176_2: R176.2 T8.2 T24.2 T39.2 T54.2 T68.2 U1.13 | length 200.1
  Top Layer w0.5: v1(128.524,42.446) 128.524,38.293 128.529,38.288 128.529,37.713 128.524,37.708 128.524,26.135 128.123,25.735 128.123,21.637 v1(128.143,21.618) 127.381,20.856 127.381,9.932 131.516,5.798 131.516,5.598 131.766,5.348 R176.2@131.966,5.348 ; T24.2@150.145,104.598 152.83,104.598 152.908,104.676 ; T8.2@150.145,123.598 152.274,123.598 152.908,122.964 152.908,104.676 ; T39.2@159.714,85.621 162.555,85.621 162.56,85.626 ; T54.2@164.592,66.602 167.868,66.602 167.894,66.576 ; T68.2@174.156,47.679 176.657,47.679 ; v1(176.657,42.446) 176.657,47.679 ; 152.908,104.676 152.908,101.755 156.591,98.072 160.782,98.072 162.56,96.294 162.56,85.626 ; 162.56,85.626 162.56,83.467 167.894,78.133 167.894,66.576 ; 167.894,66.576 167.894,63.147 170.815,60.226 175.641,60.226 176.657,59.21 176.657,47.679
  Bottom Layer w0.5: U1.13@128.143,20.094 v1(128.143,21.618) ; v1(128.524,42.446) 129.382,41.588 175.799,41.588 v1(176.657,42.446)
NetR177_2: R177.2 T9.2 T25.2 T40.2 T55.2 T69.2 T79.2 U1.12 | length 256.6
  Top Layer w0.5: v1(129.794,18.062) v1(129.794,9.155) 129.82,9.129 130.472,9.129 133.516,6.085 133.516,5.598 133.766,5.348 R177.2@133.966,5.348 ; T25.2@169.145,104.598 172.007,104.598 172.085,104.676 ; T9.2@169.145,123.598 171.705,123.598 172.085,123.218 172.085,104.676 ; T40.2@178.714,85.621 182.113,85.621 182.118,85.626 ; T55.2@183.592,66.602 188.061,66.602 188.087,66.576 ; T69.2@193.156,47.679 195.046,47.679 195.072,47.653 ; T79.2@207.531,28.629 207.557,28.603 209.931,28.603 ; v1(209.931,9.155) 209.931,39.525 207.518,41.938 199.39,41.938 195.072,46.256 195.072,47.653 ; 172.085,104.676 172.085,100.739 174.244,98.58 180.467,98.58 182.118,96.929 182.118,85.626 ; 182.118,85.626 182.118,84.356 184.404,82.07 186.69,82.07 188.087,80.673 188.087,66.576 ; 188.087,66.576 188.087,63.782 190.881,60.988 193.167,60.988 195.072,59.083 195.072,47.653
  Bottom Layer w0.5: v1(129.794,9.155) v1(209.931,9.155) ; v1(129.794,18.062) 129.82,18.087 129.82,18.94 130.683,19.803 U1.12@130.683,20.094
NetR178_2: R178.2 T10.2 T26.2 T41.2 T56.2 T70.2 T80.2 U1.11 | length 269.6
  Top Layer w0.5: v1(134.493,18.062) 134.509,18.045 134.509,10.171 v1(134.526,10.155) 135.966,8.715 R178.2@135.966,5.348 ; T26.2@188.145,104.598 191.311,104.598 191.389,104.676 ; T10.2@188.145,123.598 190.501,123.598 191.389,122.71 191.389,104.676 ; T41.2@197.714,85.621 201.046,85.621 201.168,85.499 ; T56.2@202.592,66.602 205.587,66.602 205.613,66.576 ; T70.2@212.156,47.679 215.239,47.679 215.265,47.653 ; T80.2@226.531,28.629 230.251,28.629 ; v1(230.251,10.155) 230.251,28.629 ; 191.389,104.676 191.389,101.247 193.294,99.342 198.12,99.342 201.168,96.294 201.168,85.499 ; 201.168,85.499 201.168,82.832 205.613,78.387 205.613,66.576 ; 205.613,66.576 205.613,66.322 215.265,56.67 215.265,47.653 ; 215.265,47.653 215.265,44.097 217.805,41.557 228.473,41.557 230.251,39.779 230.251,28.629
  Bottom Layer w0.5: U1.11@133.223,20.094 134.467,18.849 134.467,18.087 v1(134.493,18.062) ; v1(134.526,10.155) v1(230.251,10.155)
NetR179_2: R179.2 T11.2 T27.2 T42.2 T57.2 T71.2 T81.2 U1.10 | length 282.3
  Top Layer w0.5: v1(135.763,18.062) v1(135.763,11.155) 137.966,8.952 R179.2@137.966,5.348 ; T27.2@207.145,104.598 210.107,104.598 210.185,104.676 ; T11.2@207.145,123.598 208.789,123.598 210.185,122.202 210.185,104.676 ; T42.2@216.714,85.621 220.086,85.621 220.091,85.626 ; T57.2@221.592,66.602 224.637,66.602 224.663,66.576 ; T71.2@231.356,47.679 234.035,47.679 234.061,47.653 ; T81.2@245.531,28.629 245.811,28.349 248.031,28.349 ; v1(248.031,11.155) 248.031,28.349 ; 210.185,104.676 210.185,102.136 212.725,99.596 215.138,99.596 220.091,94.643 220.091,85.626 ; 220.091,85.626 220.091,83.848 224.663,79.276 224.663,66.576 ; 224.663,66.576 224.663,63.274 227.076,60.861 232.283,60.861 234.061,59.083 234.061,47.653 ; 234.061,47.653 234.061,45.748 236.347,43.462 244.348,43.462 248.031,39.779 248.031,28.349
  Bottom Layer w0.5: v1(135.763,11.155) v1(248.031,11.155) ; v1(135.763,18.062) U1.10@135.763,20.094
NetR180_2: R180.2 T12.2 T28.2 T43.2 T58.2 T72.2 T82.2 U1.9 | length 297.7
  Top Layer w0.5: v1(138.303,18.189) v1(138.303,12.155) 139.966,10.492 R180.2@139.966,5.348 ; T28.2@226.145,104.598 229.03,104.598 229.108,104.676 ; T12.2@226.143,123.596 228.22,123.598 229.108,122.71 229.108,104.676 ; T43.2@235.714,85.621 239.009,85.621 239.014,85.626 ; T58.2@240.592,66.602 243.739,66.602 243.84,66.703 ; T72.2@257.456,47.679 260.705,47.679 260.731,47.653 ; T82.2@264.531,28.629 267.335,28.629 ; v1(267.335,12.155) 267.335,28.629 ; 229.108,104.676 229.108,101.628 232.029,98.707 235.712,98.707 239.014,95.405 239.014,85.626 ; 239.014,85.626 239.014,82.832 243.84,78.006 243.84,66.703 ; 243.84,66.703 243.84,65.941 249.814,59.966 259.593,59.966 260.731,58.829 260.731,47.653 ; 260.731,47.653 260.731,46.637 267.335,40.033 267.335,28.629
  Bottom Layer w0.5: v1(138.303,12.155) v1(267.335,12.155) ; v1(138.303,18.189) U1.9@138.303,20.094
NetR181_2: R181.2 T13.2 T29.2 T44.2 T59.2 T73.2 T83.2 U1.8 | length 317.6
  Top Layer w0.5: v1(140.716,18.316) v1(140.716,13.155) 141.966,11.905 R181.2@141.966,5.348 ; T29.2@245.145,104.598 248.236,104.598 248.285,104.549 ; T13.2@245.145,123.598 246.762,123.598 248.285,122.075 248.285,104.549 ; T44.2@254.714,85.621 257.551,85.621 257.556,85.626 ; T59.2@271.492,66.602 275.437,66.602 275.59,66.449 ; T83.2@283.531,28.629 286.258,28.629 ; T73.2@283.546,47.679 286.157,47.679 286.258,47.78 ; v1(286.258,13.155) 286.258,28.629 ; 248.285,104.549 248.285,101.374 251.333,98.326 255.27,98.326 257.556,96.04 257.556,85.626 ; 257.556,85.626 257.556,84.102 262.89,78.768 272.796,78.768 275.59,75.974 275.59,66.449 ; 275.59,66.449 275.59,61.115 276.733,59.972 284.607,59.972 286.258,58.321 286.258,47.78 ; 286.258,28.629 286.258,47.78
  Bottom Layer w0.5: v1(140.716,13.155) v1(286.258,13.155) ; v1@140.716,18.352 140.716,19.967 U1.8@140.843,20.094
NetR182_2: R182.2 T14.2 T30.2 T45.2 T60.2 T74.2 T84.2 U1.7 | length 329.4
  Top Layer w0.5: v1(143.383,18.189) v1(143.383,14.155) 143.383,14.118 143.966,13.535 R182.2@143.966,5.348 ; T14.2@264.145,123.598 265.939,123.598 272.161,117.376 275.463,117.376 276.987,115.852 276.987,104.549 ; T30.2@273.545,104.598 276.938,104.598 276.987,104.549 ; T45.2@278.484,85.621 281.681,85.621 281.686,85.626 ; T84.2@302.145,28.629 304.699,28.629 304.8,28.73 ; T74.2@302.145,47.679 304.774,47.679 304.8,47.653 ; T60.2@302.145,66.602 304.774,66.602 304.8,66.576 ; v1(304.8,14.155) 304.8,28.73 ; 276.987,104.549 276.987,100.231 281.686,95.532 281.686,85.626 ; 281.686,85.626 285.369,81.943 291.719,81.943 294.513,79.149 303.53,79.149 304.8,77.879 304.8,66.576 ; 304.8,28.73 304.8,47.653 ; 304.8,47.653 304.8,66.576
  Bottom Layer w0.5: v1(143.383,14.155) v1(304.8,14.155) ; v1(143.383,18.189) U1.7@143.383,20.094
NetR183_2: R183.2 T15.2 T31.2 T46.2 U1.2 | length 319.6
  Top Layer w0.5: v1(145.923,15.141) 145.944,15.119 145.944,5.369 R183.2@145.966,5.348 ; v1(155.067,15.155) v1(155.067,18.57) ; T15.2@283.143,123.596 286.513,123.598 293.116,116.995 302.829,116.995 305.435,114.389 305.435,104.422 ; T46.2@302.145,85.621 305.435,85.621 ; T31.2@302.145,104.598 305.259,104.598 305.435,104.422 ; v1(305.435,81.689) 305.435,85.621 ; v1(311.658,81.689) 311.658,67.846 312.039,67.465 v1(312.039,15.155) ; 305.435,85.621 305.435,104.422
  Bottom Layer w0.5: v1(145.923,15.141) 145.93,15.148 155.023,15.148 v1@155.03,15.155 ; v1(155.067,15.155) v1(312.039,15.155) ; v1(155.067,18.57) 155.093,18.595 155.093,18.91 156.083,19.9 U1.2@156.083,20.094 ; v1(305.435,81.689) v1(311.658,81.689)
NetR184_2: R184.2 T16.2 U1.1 | length 296.1
  Top Layer w0.5: v1(147.955,16.157) 147.96,16.151 147.96,5.353 R184.2@147.966,5.348 ; v1(157.353,16.155) v1(157.353,18.697) ; T16.2@302.145,123.596 304.293,123.598 306.705,121.186 310.642,121.186 311.938,119.889 311.938,83.186 312.674,82.451 312.674,68.862 313.182,68.354 v1(313.182,16.155)
  Bottom Layer w0.5: v1(147.955,16.157) 147.956,16.156 v1(157.353,16.155) v1@157.353,16.157 ; v1(157.353,16.155) v1(313.182,16.155) ; v1(157.353,18.697) 157.379,18.722 157.379,18.849 U1.1@158.623,20.094
pads on no net: U1. U1.3 U1.5 U1.19 U1.20 U1.27 U1.28 U1.30 U1.32
copper on no net:
  other v1: 205.809,0.318
  other v2: 41.229,31.25 64.979,31.25 136.23,31.25 26.965,50.248 300.106,69.25 19.864,88.25 43.644,88.25 100.644,88.25 119.644,88.25 138.646,88.25 157.644,88.25 176.644,88.25 195.644,88.25 214.644,88.25 233.644,88.25 276.404,88.25 300.106,88.25 81.675,88.275 15.103,107.244 34.104,107.25 129.104,107.25 167.104,107.25 186.104,107.25 224.104,107.25 300.104,107.25 15.105,126.246 34.104,126.25 53.104,126.25 72.104,126.25 91.104,126.25 110.104,126.25 129.104,126.25 148.104,126.25 167.104,126.25 186.104,126.25 205.104,126.25 224.104,126.25 243.104,126.25 262.104,126.25 281.104,126.25 300.106,126.25
  other v3: 18.127,3.282 78.727,3.282 118.727,3.282 158.727,3.282 198.227,3.282 238.227,3.282 298.227,3.282 132.127,17.282 30.127,25.282 78.627,25.282 215.127,25.282 272.127,25.282 87.127,50.282 163.127,50.282 220.127,50.282 41.027,79.282 111.127,79.382 186.127,79.382 248.127,79.382 289.127,79.382 25.027,107.282 82.027,107.282 158.027,107.282 234.127,107.282 291.127,107.282 44.027,132.482 101.027,132.482 177.027,132.482 272.027,132.482

## Polygon pours and split planes (outlines as drawn)
NetR93_2 on Bottom Layer "ROW_1" (solid, pour order 4): 11.43,72.672 250.952,72.672 250.952,73.434 11.43,73.434
GND on Bottom Layer "GND_BOTTOM" (solid, pour order 29): 0.127,102.282 2.127,102.282 8.731,47.14 8.731,0.321 315.127,0.321 315.127,135.282 0.127,135.282
NetR1_2 on Bottom Layer "ROW_1" (solid, pour order 0): 4.191,130.457 291.211,130.457 291.211,131.473 274.193,131.473 273.939,131.219 270.891,131.219 270.637,131.473 178.816,131.473 178.562,131.219 175.768,131.219 175.514,131.473 102.997,131.473 102.743,131.219 99.314,131.219 99.06,131.473 46.228,131.473 45.974,131.219 42.672,131.219 42.418,131.473 4.191,131.473
NetR33_2 on Bottom Layer "ROW_1" (solid, pour order 2): 4.318,111.661 253.365,111.661 253.365,112.423 4.318,112.423
NetR63_2 on Bottom Layer "ROW_1" (solid, pour order 3): 9.271,92.738 288.798,92.738 288.798,93.5 9.271,93.5
NetR121_2 on Bottom Layer "ROW_1" (solid, pour order 5): 46.482,54.765 291.465,54.765 291.465,55.527 46.482,55.527
NetR149_2 on Bottom Layer "ROW_1" (solid, pour order 6): 28.321,35.715 52.705,35.715 52.705,36.604 28.321,36.604
NetR149_2 on Bottom Layer "ROW_1" (solid, pour order 7): 194.564,35.715 290.449,35.715 290.449,36.604 194.564,36.604
+5 on Bottom Layer "+5V" (solid, pour order 8): 24.257,120.894 310.769,120.894 310.769,121.567 24.257,121.567
+5 on Bottom Layer "+5V" (solid, pour order 10): 24.257,102.155 252.73,102.155 252.73,102.917 24.257,102.917
+5 on Bottom Layer "+5V" (solid, pour order 11): 30.48,83.848 311.023,83.848 311.023,84.61 30.48,84.61
+5 on Bottom Layer "+5V" (solid, pour order 12): 34.671,63.782 250.571,63.782 250.571,64.544 34.671,64.544
+5 on Bottom Layer "+5V" (solid, pour order 13): 46.355,45.875 310.896,45.875 310.896,46.637 46.355,46.637
NetQ1_3 on Bottom Layer "NetQ1_3" (solid, pour order 16): 15.748,129.314 301.752,129.314 301.752,130.076 15.748,130.076
NetQ1_3 on Bottom Layer "NetQ1_3" (solid, pour order 18): 15.748,110.137 244.602,110.137 244.602,110.899 15.748,110.899
NetQ1_3 on Bottom Layer "NetQ1_3" (solid, pour order 19): 20.574,91.341 301.752,91.341 301.752,92.103 20.574,92.103
NetQ1_3 on Bottom Layer "NetQ1_3" (solid, pour order 20): 23.114,71.656 240.944,71.656 240.944,72.418 23.114,72.418
NetQ1_3 on Bottom Layer "NetQ1_3" (solid, pour order 21): 58.674,52.987 303.216,52.987 303.216,53.749 58.674,53.749
NetQ1_3 on Bottom Layer "NetQ1_3" (solid, pour order 23): 18.415,33.81 66.675,33.81 66.675,34.699 18.415,34.699
NetQ1_3 on Bottom Layer "NetQ1_3" (solid, pour order 24): 206.121,33.81 301.625,33.81 301.625,34.699 206.121,34.699
+5 on Bottom Layer "+5_L02_P025" (solid, pour order 25): 24.257,102.155 252.73,102.155 252.73,102.917 24.257,102.917
GND on Top Layer "GND_TOP" (solid, pour order 30): 0.127,102.282 2.127,102.282 8.731,47.14 8.731,0.321 315.127,0.321 315.127,135.282 0.127,135.282

## Silkscreen, mask and mechanical layers (free items; w line width, h text height)
Mechanical 1:
  circle w0.013: c119.605,130.749 r1.25
  lines w0.254: 0.127,102.282 0.127,135.282 315.127,135.282 315.127,0.321 8.731,0.321 8.731,47.14 2.127,102.282 0.127,102.282
Mechanical 13:
  lines w0.254: 15.104,133.251 15.109,119.252 ; 15.111,126.252 15.959,126.252